# Altium PCB AltiumSM32PCB.PcbDoc
Units mm, origin at the board's own origin, x right, y up, seen from the top; angles counter-clockwise.
Board outline 30.5 x 32 mm, 4 copper layers (L1(Signal), L2(GND), L3(GND), L4(Signal)), stack 1.57 mm thick; 35 components, 27 nets, 169 pads, 95 vias.
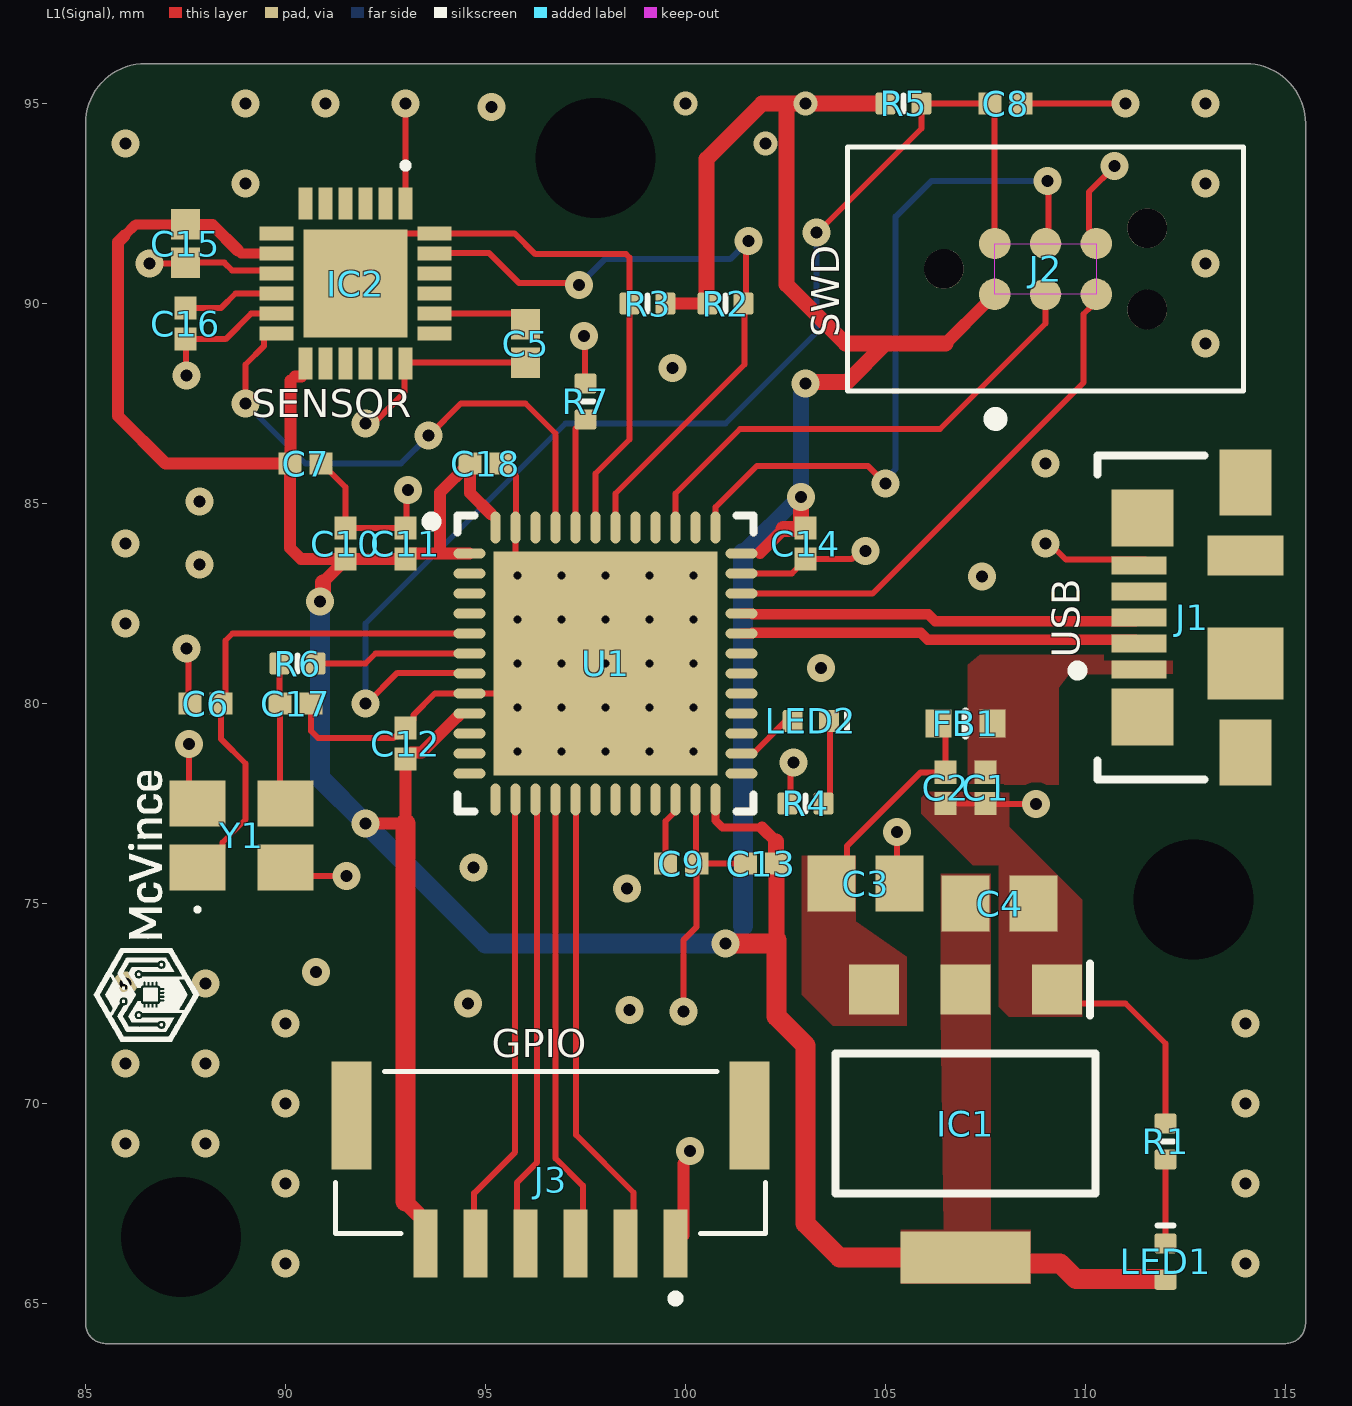
[diagram p0: L1(Signal) view]
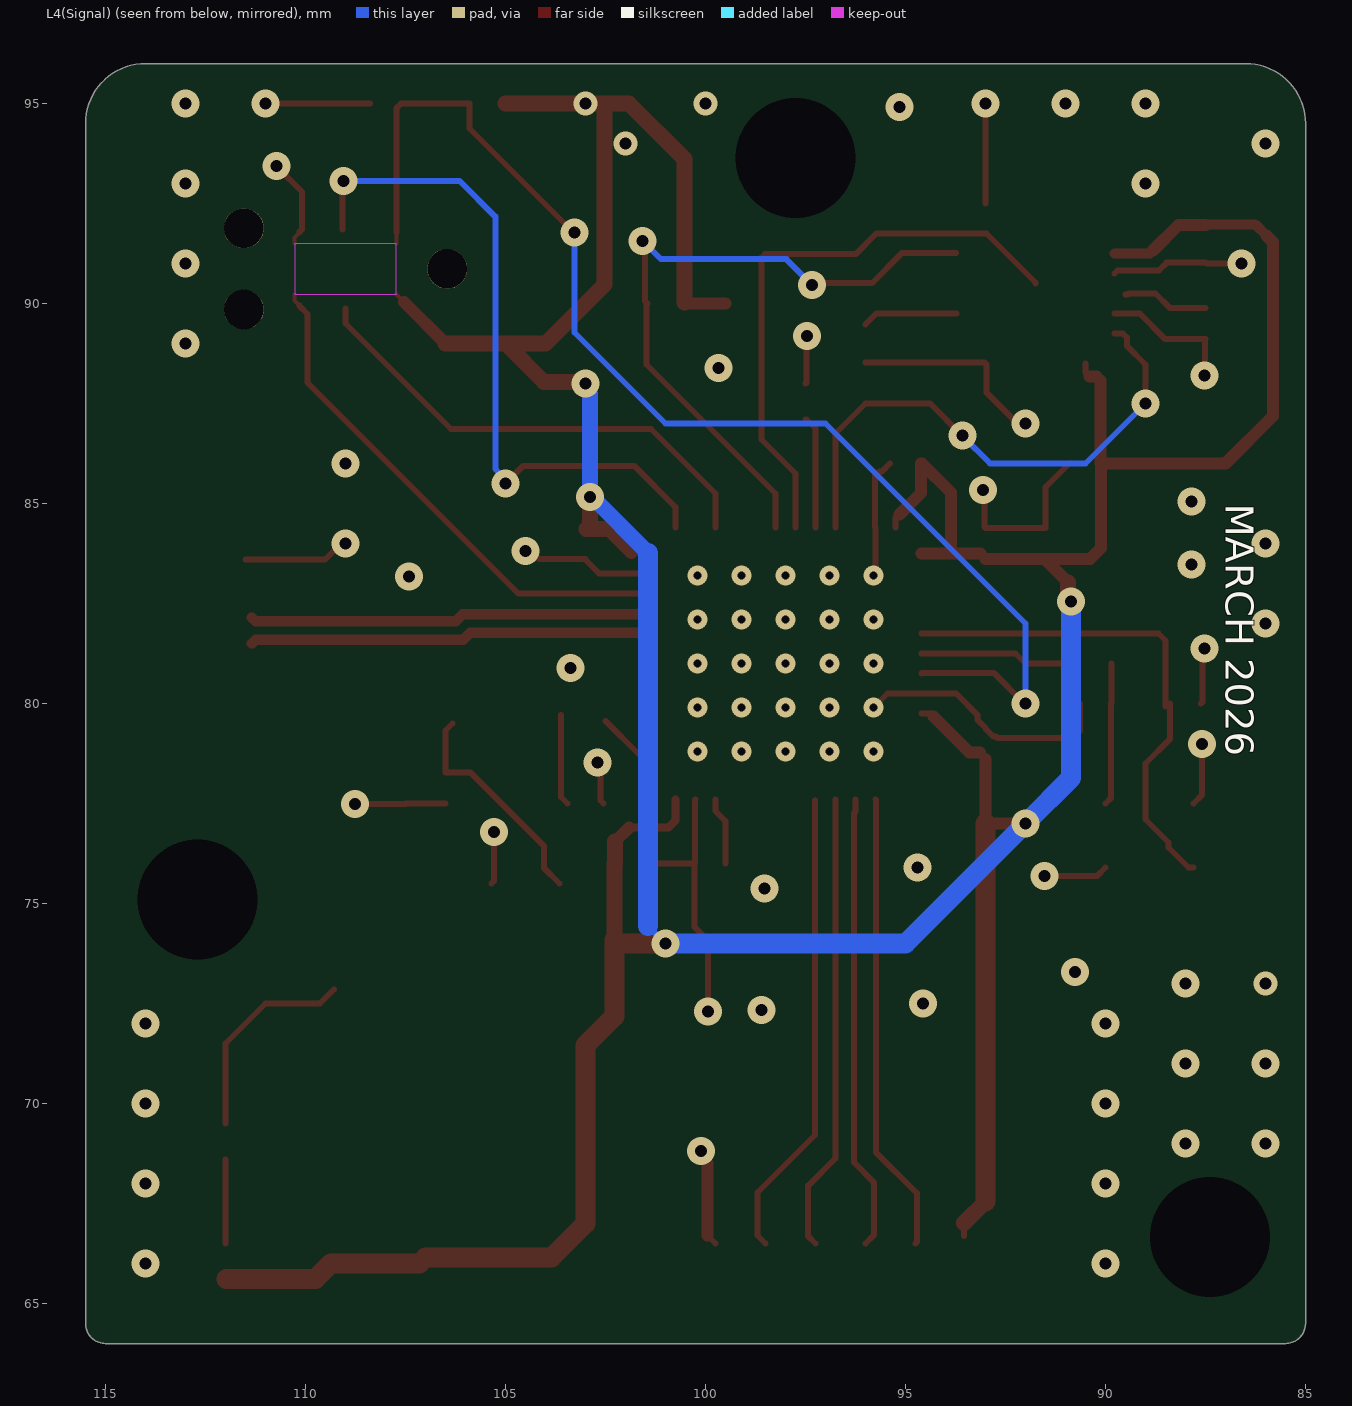
[diagram p1: L4(Signal) view, seen from below]
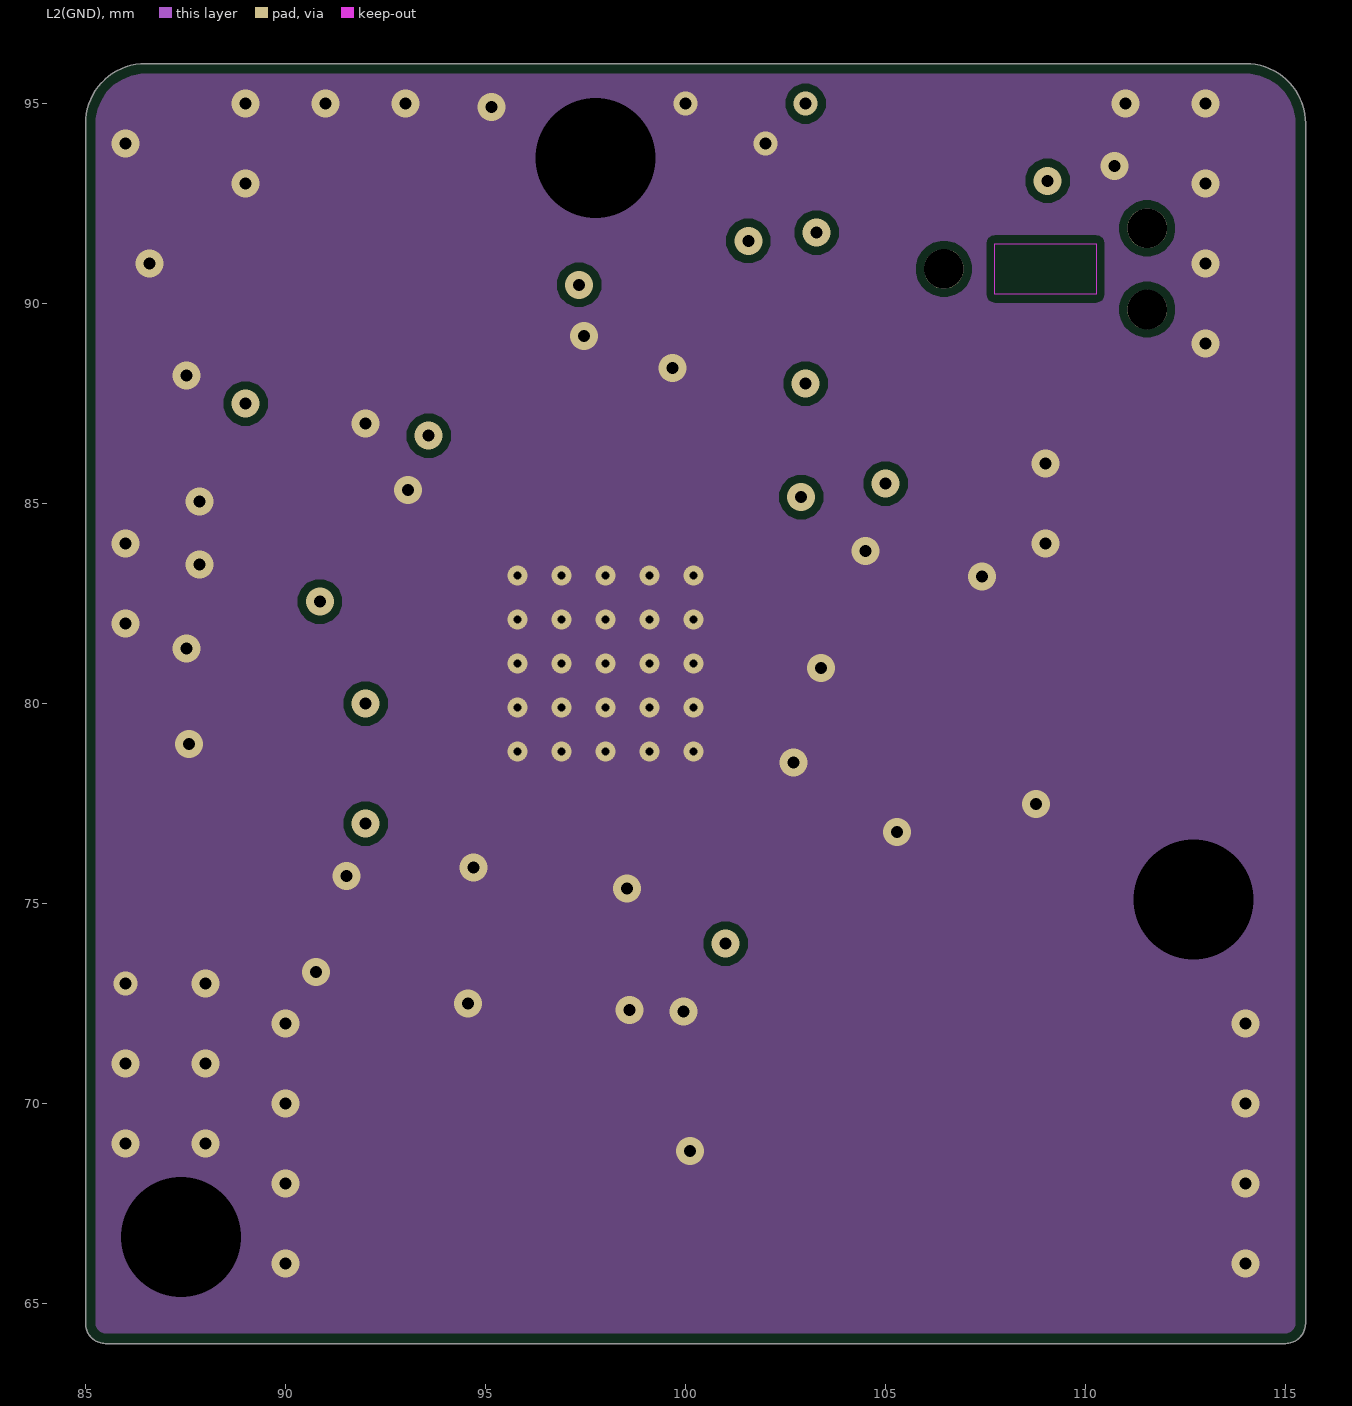
[diagram p2: L2(GND)]
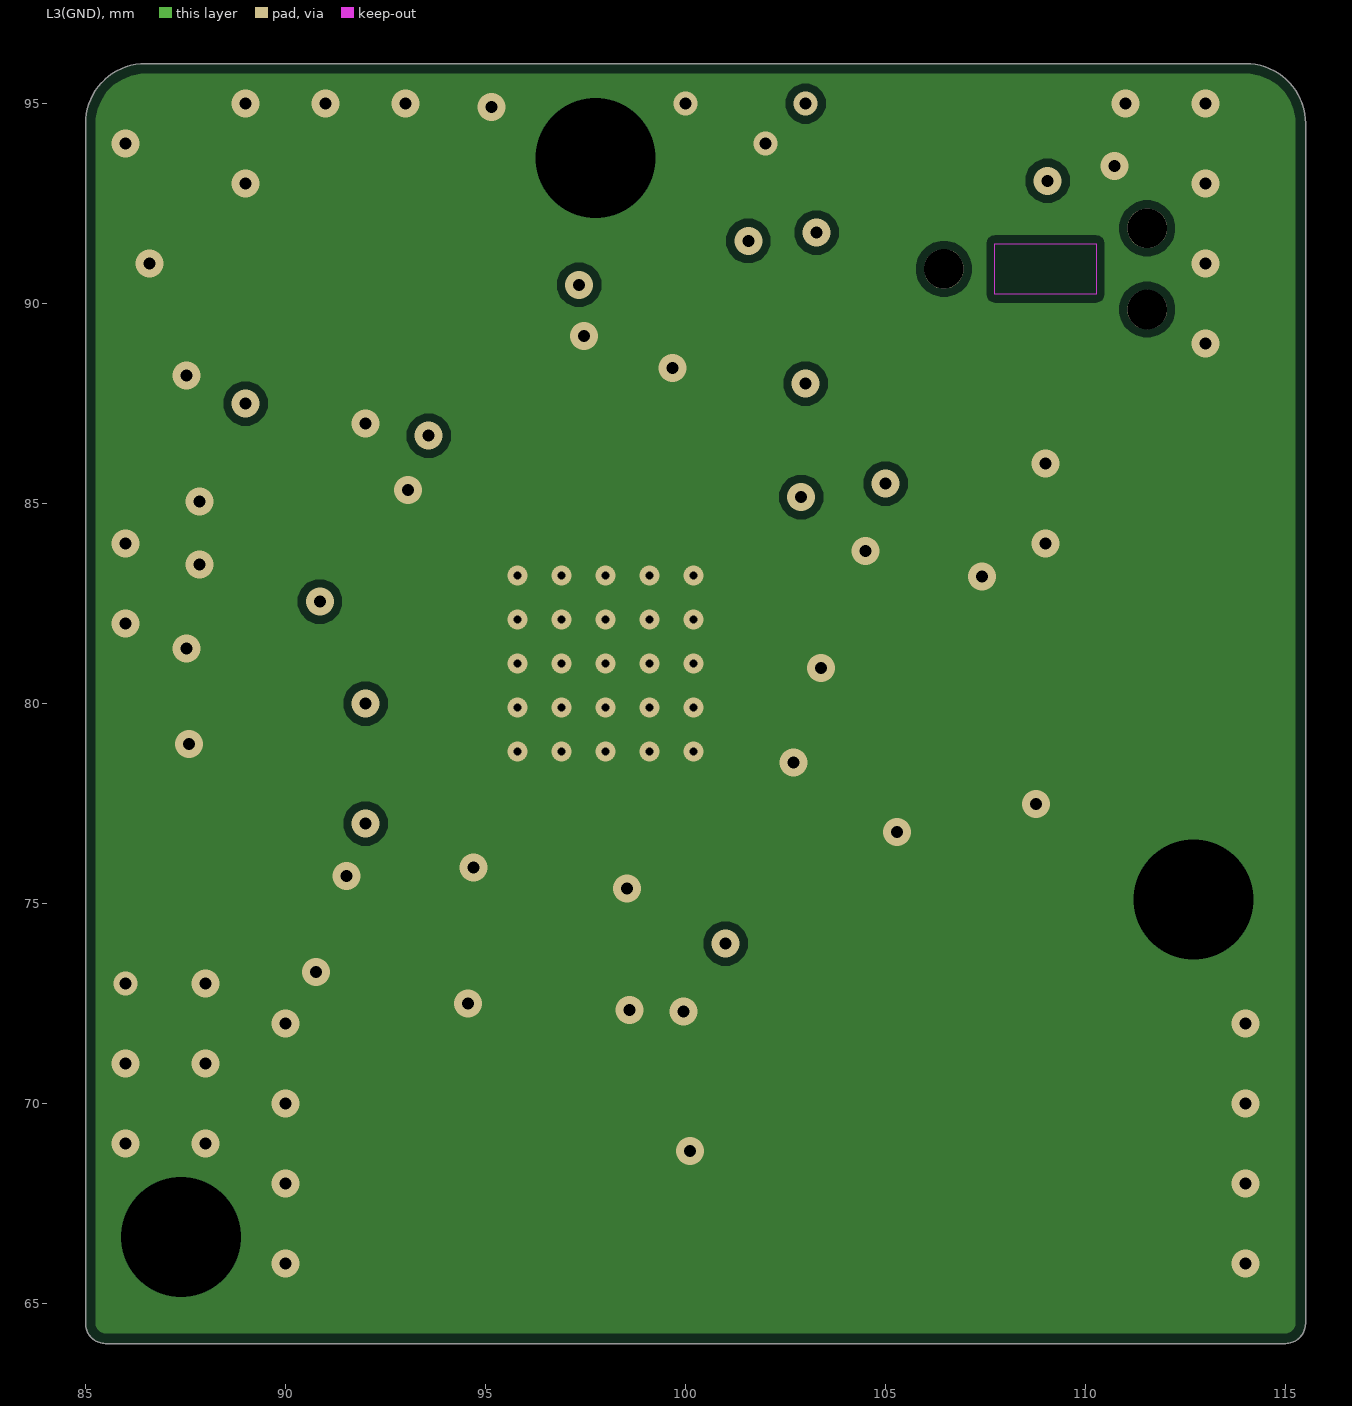
[diagram p3: L3(GND)]
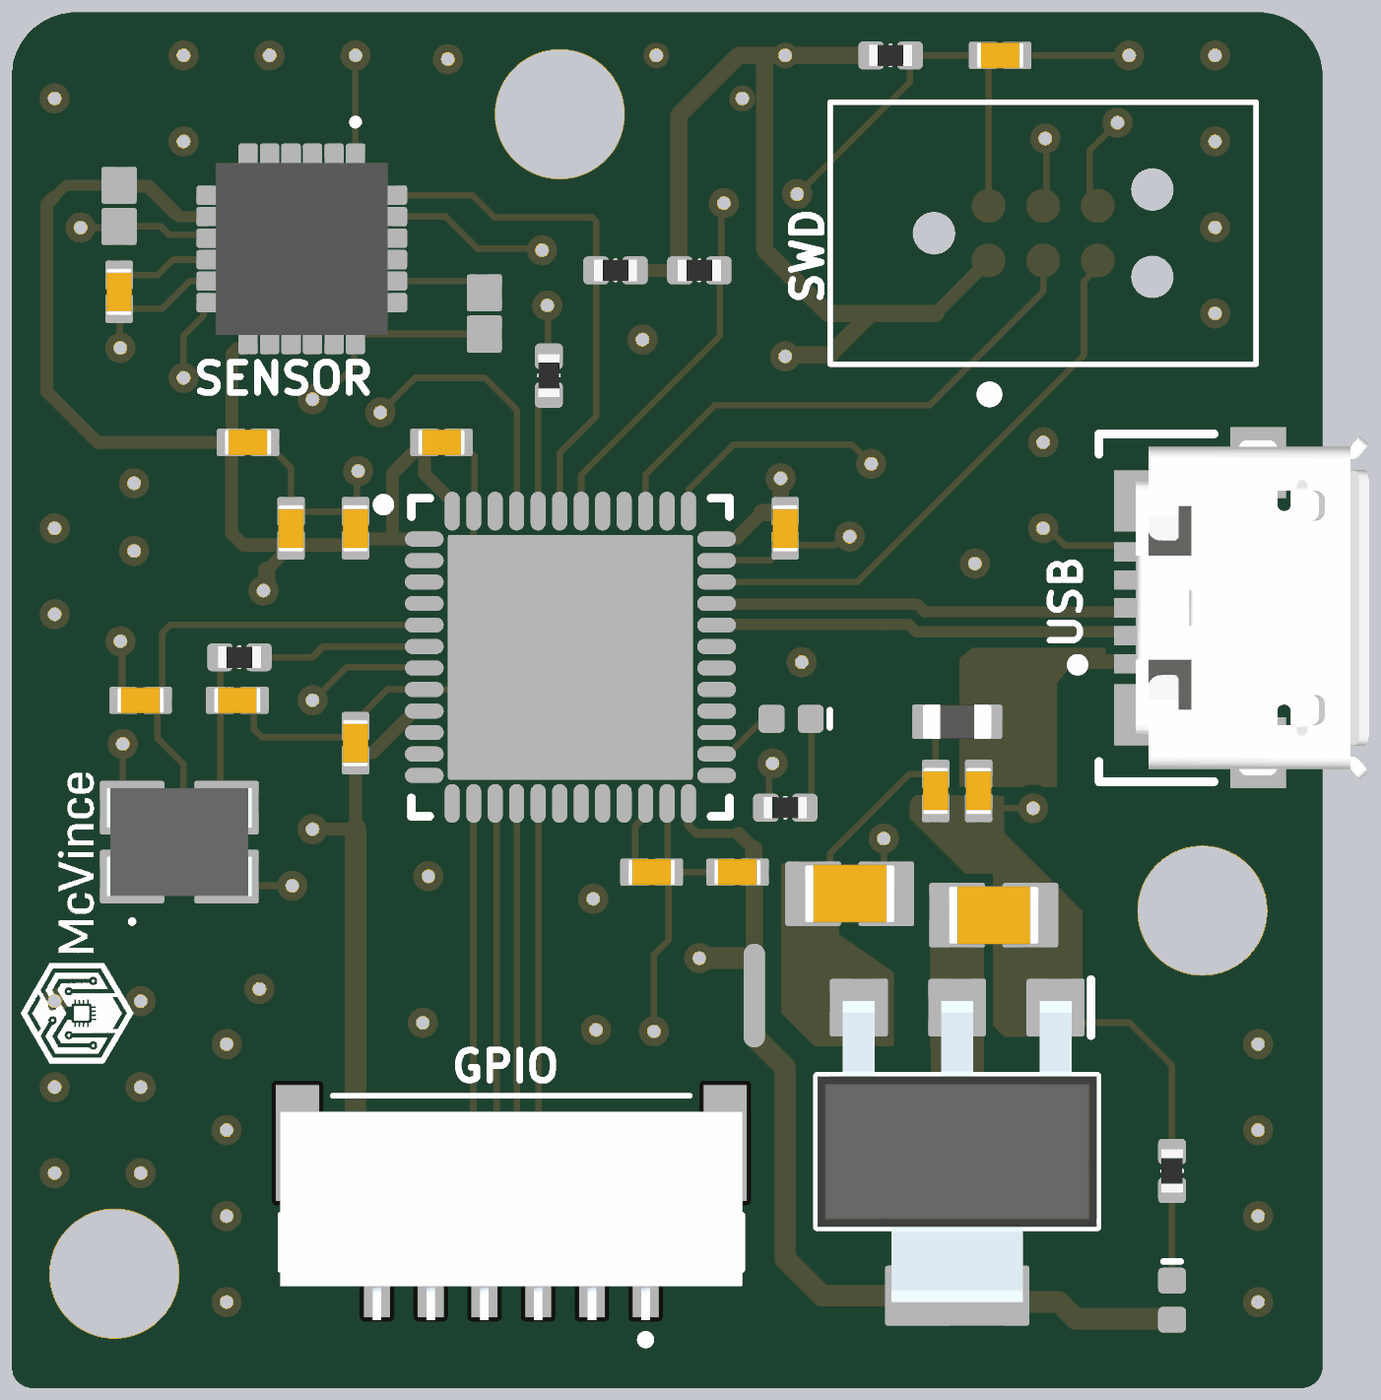
[diagram p4: 3D render of the assembled board from above, using the file's embedded part models]

## Layer stack, top to bottom
Top Solder: solder mask 0.0254, SM-001, Dk 4
L1(Signal): signal copper 0.035
Dielectric 1: prepreg 0.2, PP-017, Dk 4.6
L2(GND): signal copper 0.0175
Dielectric 2: core 1.065, Core-039, Dk 4.6
L3(GND): signal copper 0.0175
Dielectric 3: prepreg 0.2, PP-017, Dk 4.6
L4(Signal): signal copper 0.035
Bottom Solder: solder mask 0.0254, SM-001, Dk 4

## Board outline
85,64.5 ccw(c85.5,64.5) 85.5,64 115,64 ccw(c115,64.5) 115.5,64.5 115.5,94.5 ccw(c114,94.5) 114,96 86.5,96 ccw(c86.5,94.5) 85,94.5

## Design rules (kind name [scope] priority, off if disabled: settings)
BoardOutlineClearance [All] p1: gap=0.254 ignorepadtopadclearanceinfootprint=FALSE except(0: Arc-SplitContinuation Track-SplitContinuation SMDPad-SplitContinuation THPad-SplitContinuation Via-SplitContinuation Fill-SplitContinuation Poly-SplitContinuation Region-SplitContinuation Text-SplitContinuation)
Clearance [All] p1: gap=0.2 ignorepadtopadclearanceinfootprint=FALSE
DiffPairsRouting [All] p1: maxlimit=0.203 minlimit=0.203 mostfreqgap=0.203 toplayer_minwidth=0.26 toplayer_maxwidth=0.26 toplayer_prefwidth=0.26 bottomlayer_minwidth=0.26 bottomlayer_maxwidth=0.26 bottomlayer_prefwidth=0.26 impedanceprofiledriven=TRUE impedanceprofileid={EBFDF36F-0FDD-4D75-9C87-6BF0BFB171E8} impedanceprofilevalue=90.000000 maxuncoupledlength=12.7
HoleSize [All] p1: absolutevalues=TRUE maxlimit=2.54 minlimit=0.2 maxpercent=80.000 minpercent=20.000
HoleToHoleClearance [All] p1: gap=0.3 allowstackedmicrovias=TRUE
MinimumSolderMaskSliver [All] p1: minsoldermaskwidth=0.2
PasteMaskExpansion [All] p1: expansion=0.05
PlaneClearance [All] p1: clearance=0.2
PolygonConnect [All] p1: thpad.connectstyle=Relief thpad.reliefconductorwidth=0.35 thpad.reliefentries=4 thpad.polygonreliefangle="90 Angle" thpad.airgapwidth=0.35 smdpad.connectstyle=Relief smdpad.reliefconductorwidth=0.3 smdpad.reliefentries=4 smdpad.polygonreliefangle="90 Angle" smdpad.airgapwidth=0.3 via.connectstyle=Direct via.reliefconductorwidth=0.254 via.reliefentries=4 via.polygonreliefangle="90 Angle" via.airgapwidth=0.254
RoutingVias [All] p1: holewidth=0.3 width=0.6 viastyle="Through Hole" minholewidth=0.2 minwidth=0.45 maxholewidth=0.5 maxwidth=0.9
SilkToSilkClearance [All] p1: silktosilkclearance=0.2
SilkToSolderMaskClearance [IsPad] p1: minsilkscreentomaskgap=0.2 clearancetoexposedcopper=TRUE
SolderMaskExpansion [All] p1: expansion=0.2 istentingtop=TRUE soldermaskfromhole=TRUE
SupplyNets "Schematic Supply Nets_3" [InNet('VBUS')] p1: voltage=0.000
SupplyNets "Schematic Supply Nets_2" [InNet('+3V3')] p2: voltage=0.000
SupplyNets "Schematic Supply Nets_1" [InNet('GND')] p3: voltage=0.000
SupplyNets "Schematic Supply Nets" [InNet('+5V')] p4: voltage=0.000
UnRoutedNet [All] p1: checkbadconnections=TRUE
Width Signal [InNetClass('Signal')] p1: maxlimit=0.3 minlimit=0.1 preferedwidth=0.2
Width Power [InNetClass('POWER')] p2: maxlimit=0.5 minlimit=0.15 preferedwidth=0.3
21 further rules are at their usual default settings.

## Classes and differential pairs
net class Signal: GND "IMU CPOUT" "IMU INT" "IMU REGOUT" "IMU SCL" "IMU SDA" "LED PWR K" "MCU BOOT0" "MCU LED A" "MCU LED K" "MCU NRST" "MCU OSC IN" "MCU OSC OUT" "MCU PA4" "MCU PA5" "MCU PA6" "MCU PA7" "MCU SWCLK" "MCU SWDIO" "MCU SWO" "MCU VCAP1" USB_D_N USB_D_P VBUS "XTAL IN"
net class Power: +3V3 +5V
differential pair USB_D: +USB_D_P -USB_D_N

## Components (designator, comment, footprint, x,y, rotation, side; value= is the part's Value field where it differs from the comment)
C1 "Capacitor 0.1 uF +/- 5% 16 V 0402" CAPC1005X56X25LL10T15 107.5,77.89 r270 top value=2u2
C2 "Capacitor 0.1 uF +/- 5% 16 V 0402" CAPC1005X56X25LL10T15 106.5,77.89 r270 top value=2u2
C3 "Capacitor 10 uF +/- 10% 16 V 0805" CAPC2013X135X45NL10T25 104.5,75.5 r180 top value=22u
C4 "Capacitor 10 uF +/- 10% 16 V 0805" CAPC2013X135X45NL10T25 107.85,75 r180 top value=22u
C5 "2n2" CAPC1005X60X30ML05T10 96,89 r90 top
C6 "Capacitor 0.1 uF +/- 5% 16 V 0402" CAPC1005X56X25LL10T15 88,80 r0 top value=10pF
C7 "Capacitor 0.1 uF +/- 5% 16 V 0402" CAPC1005X56X25LL10T15 90.5,86 r180 top value=100nF
C8 "Capacitor 0.1 uF +/- 5% 16 V 0402" CAPC1005X56X25LL10T15 108,95 r180 top value=100nF
C9 "Capacitor 0.1 uF +/- 5% 16 V 0402" CAPC1005X56X25LL10T15 99.89,76 r0 top value=2.2uF
C10 "Capacitor 0.1 uF +/- 5% 16 V 0402" CAPC1005X56X25LL10T15 91.5,84 r90 top value=2u2
C11 "Capacitor 0.1 uF +/- 5% 16 V 0402" CAPC1005X56X25LL10T15 93,84 r270 top value=100nF
C12 "Capacitor 0.1 uF +/- 5% 16 V 0402" CAPC1005X56X25LL10T15 93,79 r270 top value=100nF
C13 "Capacitor 0.1 uF +/- 5% 16 V 0402" CAPC1005X56X25LL10T15 101.89,76 r0 top value=100nF
C14 "Capacitor 0.1 uF +/- 5% 16 V 0402" CAPC1005X56X25LL10T15 103,84 r90 top value=100nF
C15 "10nF" CAPC1005X60X30ML05T10 87.5,91.5 r270 top
C16 "Capacitor 0.1 uF +/- 5% 16 V 0402" CAPC1005X56X25LL10T15 87.5,89.5 r90 top value=100nF
C17 "Capacitor 0.1 uF +/- 5% 16 V 0402" CAPC1005X56X25LL10T15 90.25,80 r0 top value=10pF
C18 "Capacitor 0.1 uF +/- 5% 16 V 0402" CAPC1005X56X25LL10T15 95,86 r180 top value=100nF
FB1 "BLM18DN151SN1D" BLM18SP221SN1B 107,79.5 r180 top
IC1 "AMS1117-3.3" SOT229P700X180-4N 107,69.5 r270 top
IC2 "MPU-6050" MPU6050 91.75,90.5 r270 top
J1 "473460001" FP-473460001-MFG 113.65,82.15 r90 top
J2 "TC2030-IDC-NL" TAG_TC2030-IDC-NL 109,90.865 r0 top
J3 "SM06B-GHS-TB" JST_SM06B-GHS-TB 96.625,68.375 r180 top
LED1 "QBLP595-IG" QTB-QBLP595_V 112,66.045 r270 top
LED2 "QBLP595-IG" QTB-QBLP595_V 103.135,79.568 r180 top
R1 "2D2R2J" RESC0402(1005)_L 112,69.05 r270 top value=1k
R2 "2D2KR2J" RESC0402(1005)_L 101,90 r180 top value=2.2k
R3 "2D2KR2J" RESC0402(1005)_L 99.05,90 r0 top value=2.2k
R4 "2D2R2J" RESC0402(1005)_L 103,77.5 r180 top value=1k
R5 "10KR2F" RESC0402(1005)_L 105.45,95 r180 top value=10k
R6 "10KR2F" RESC0402(1005)_L 90.3,81 r180 top value=0R
R7 "10KR2F" RESC0402(1005)_L 97.5,87.55 r270 top value=10k
U1 "STM32F411CEU6" STM-UFQFPN48_L 98,81 r0 top
Y1 "TSX-322524.0000MF15X-AC0" TSX3225240000MF15XAC0 88.9,76.7 r0 top

## Footprints (in the part's own frame and the unit in brackets; to place one, negate y for a bottom-side part, rotate by r counter-clockwise, add the part's x,y. Pads: shape width x height; smd on the part's side, far side on the other; paste and mask are expansions set on the pad)
BLM18SP221SN1B [mm]
  rect 0.65x0.7 smd: 1(-0.675,0) 2(0.675,0)
  silkscreen extent 0,-0.3 0,0.3, body extent -0.8,-0.4 0.8,0.4, height 0.8
CAPC1005X56X25LL10T15 [mm] "Chip Capacitor, 2-Leads, Body 1.10x0.60mm, IPC High Density"
  rect 0.58x0.54 smd: 1(-0.39,0) 2(0.39,0)
  body extent -0.55,-0.3 0.55,0.3, height 0.56
CAPC1005X60X30ML05T10 [mm] "Chip Capacitor, 2-Leads, Body 1.00x0.50mm, IPC Low Density"
  rect 0.76x0.72 smd: 1(-0.48,0) 2(0.48,0)
  body extent -0.53,-0.28 0.53,0.27, height 0.6
CAPC2013X135X45NL10T25 [mm] "Chip Capacitor, 2-Leads, Body 2.10x1.35mm, IPC Medium Density"
  rect 1.2x1.4 smd: 1(-0.85,0) 2(0.85,0)
  body extent -1.05,-0.67 1.05,0.67, height 1.35
FP-473460001-MFG [mm]
  rect 0.45x1.38 smd paste+0 mask+0: 1(-1.3,2.31) 2(-0.65,2.31) 3(0,2.31) 4(0.65,2.31) 5(1.3,2.31)
  rect 1.425x1.55 smd paste+0 mask+0: 6(-2.488,2.225) 7(2.487,2.225)
  rect 1.65x1.3 smd paste+0 mask+0: 8(-3.375,-0.35) 11(3.375,-0.35)
  rect 1.8x1.9 smd paste+0 mask+0: 9(-1.15,-0.35)
  rect 1x1.9 smd paste+0 mask+0: 10(1.55,-0.35)
  silkscreen extent -4.04,0.67 4.05,3.97, body extent -4.3,-2.48 4.3,3.45, height 0.25
JST_SM06B-GHS-TB [mm]
  rect 0.6x1.7 smd paste+0 mask+0.102: 1(-3.125,1.875) 2(-1.875,1.875) 3(-0.625,1.875) 4(0.625,1.875) 5(1.875,1.875) 6(3.125,1.875)
  rect 1x2.7 smd paste+0 mask+0.102: MP1(-4.975,-1.325) MP2(4.975,-1.325)
  silkscreen extent -5.37,-2.43 5.37,3.35, body extent -5.38,-2.05 5.38,2.8, height 4.25
MPU6050 [mm]
  rect 0.8x0.35 smd: 1(-2,1.25) 2(-2,0.75) 3(-2,0.25) 4(-2,-0.25) 5(-2,-0.75) 6(-2,-1.25) 13(2,-1.25) 14(2,-0.75) 15(2,-0.25) 16(2,0.25) 17(2,0.75) 18(2,1.25)
  rect 0.35x0.85 smd: 7(-1.25,-1.975) 8(-0.75,-1.975) 9(-0.25,-1.975) 10(0.25,-1.975) 11(0.75,-1.975) 12(1.25,-1.975) 19(1.25,1.975) 20(0.75,1.975) 21(0.25,1.975) 22(-0.25,1.975) 23(-0.75,1.975) 24(-1.25,1.975)
  rect 2.7x2.6 smd: 25(0,0)
  silkscreen extent -3,1.2 -2.9,1.3, body extent -2,-2 2,2, height 0.88
QTB-QBLP595_V [mm] "SMD, 2-Leads, Body 1x0.5mm"
  rrect25% 0.5x0.55 smd: 1(-0.455,0) 2(0.455,0)
  silkscreen extent -0.9,-0.2 -0.9,0.2, body extent -0.5,-0.25 0.5,0.25, height 0.5
RESC0402(1005)_L [mm] "Chip Resistor, Body 1.0x0.5mm, IPC High Density"
  rrect25% 0.5x0.55 smd: 1(-0.45,0) 2(0.45,0)
  silkscreen extent 0,-0.2 0,0.2, body extent -0.5,-0.25 0.5,0.25, height 0.3
SOT229P700X180-4N [mm]
  rect 1.25x1.25 smd: 1(-3.35,2.29) 2(-3.35,0) 3(-3.35,-2.29)
  rect 1.3x3.25 smd: 4(3.35,0)
  silkscreen extent -4,-3.25 1.75,3.25, body extent -3.5,-3.25 3.5,3.25, height 1.8
STM-UFQFPN48_L [mm] "QFN, 48-Leads, Body 7.1x7.1mm, Pitch 0.5mm, Thermal Pad 5.6x5.6mm, IPC High Density"
  oval 0.8x0.25 smd: 1(-3.4,2.75) 2(-3.4,2.25) 3(-3.4,1.75) 4(-3.4,1.25) 5(-3.4,0.75) 6(-3.4,0.25) 7(-3.4,-0.25) 8(-3.4,-0.75) 9(-3.4,-1.25) 10(-3.4,-1.75) 11(-3.4,-2.25) 12(-3.4,-2.75) 25(3.4,-2.75) 26(3.4,-2.25) 27(3.4,-1.75) 28(3.4,-1.25) 29(3.4,-0.75) 30(3.4,-0.25) 31(3.4,0.25) 32(3.4,0.75) 33(3.4,1.25) 34(3.4,1.75) 35(3.4,2.25) 36(3.4,2.75)
  oval 0.25x0.8 smd: 13(-2.75,-3.4) 14(-2.25,-3.4) 15(-1.75,-3.4) 16(-1.25,-3.4) 17(-0.75,-3.4) 18(-0.25,-3.4) 19(0.25,-3.4) 20(0.75,-3.4) 21(1.25,-3.4) 22(1.75,-3.4) 23(2.25,-3.4) 24(2.75,-3.4) 37(2.75,3.4) 38(2.25,3.4) 39(1.75,3.4) 40(1.25,3.4) 41(0.75,3.4) 42(0.25,3.4) 43(-0.25,3.4) 44(-0.75,3.4) 45(-1.25,3.4) 46(-1.75,3.4) 47(-2.25,3.4) 48(-2.75,3.4)
  rect 5.6x5.6 smd: 49(0,0)
  silkscreen extent -4.47,-3.7 3.7,3.7, body extent -3.55,-3.55 3.55,3.55, height 0.6
TAG_TC2030-IDC-NL [mil]
  round 30.98 smd paste-39.37: 1(-50,-25) 2(-50,25) 3(0,-25) 4(0,25) 5(50,-25) 6(50,25)
  round 39.02 hole 39.02 unplated: MH(-100,0) MH(100,-40) MH(100,40)
  Keep-Out Layer region: 50,-25.03 -50.06,-25.03 -50.06,25 50,25
  silkscreen extent -195,-154 195,120
TSX3225240000MF15XAC0 [mm]
  rect 1.4x1.15 smd: 1(-1.1,-0.8) 2(1.1,-0.8) 3(1.1,0.8) 4(-1.1,0.8)
  silkscreen extent -1.15,-1.9 -1.05,-1.8, body extent -1.69,-1.26 1.69,1.26, height 0.7

## Part data
C1 C2 C6 C7 C8 C9 C10 C11 C12 C13 C14 C16 C17 C18: library part CMP-001-00001-6, "Chip Capacitor, 0.1 uF, +/- 5%, 16 V, 0402 (1005 Metric)", Capacitor Type=Ceramic, Case/Package=0402, Max Operating Temperature=125°C, Min Operating Temperature=-55°C, Tolerance=5%, Voltage Rating=16V, Mounting Technology=SM, Pins=2, RoHS Compliant=True
C3 C4: library part CMP-001-00015-6, "Chip Capacitor, 10 uF, +/- 10%, 16 V, 0805 (2012 Metric)", Capacitor Type=Ceramic, Case/Package=0805, Max Operating Temperature=85°C, Min Operating Temperature=-55°C, Tolerance=10%, Voltage Rating=16V, Mounting Technology=SM, Pins=2, RoHS Compliant=True
C5 C15: library part CMP-2008-02193-1, Manufacturer=Kemet, Part Number=C0402T103K4RACTU
FB1: "Ferrite Bead", Manufacturer_Name="Murata Electronics", Mouser Part Number=81-BLM18DN151SN1D, Arrow Part Number=BLM18DN151SN1D, Arrow Price/Stock=https://www.arrow.com/en/products/blm18dn151sn1d/murata-manufacturing?utm_currency=USD&region=nac, Datasheet Link=http://www.murata.com/~/media/webrenewal/support/library/catalog/products/emc/emifil/c31e.ashx?la=en-gb, Height=0.95mm, Manufacturer_Part_Number=BLM18DN151SN1D, Mouser Price/Stock=https://www.mouser.co.uk/ProductDetail/Murata-Electronics/BLM18DN151SN1D?qs=17u8i%2FzlE88YmV2XnmFi9A%3D%3D
IC1: "Integrated Circuit", Manufacturer_Name="ams OSRAM", Datasheet Link=http://www.advanced-monolithic.com/pdf/ds1117.pdf, Height=1.8mm, Manufacturer_Part_Number=AMS1117-3.3
IC2: "Integrated Circuit", Manufacturer_Name=TDK, Mouser Part Number=410-MPU-6050, Arrow Part Number=MPU-6050, Arrow Price/Stock=https://www.arrow.com/en/products/mpu-6050/invensense?region=nac, Datasheet Link=https://product.tdk.com/system/files/dam/doc/product/sensor/mortion-inertial/imu/data_sheet/mpu-6000-datasheet1.pdf, Height=0.95mm, Manufacturer_Part_Number=MPU-6050, Mouser Price/Stock=https://www.mouser.co.uk/ProductDetail/TDK-InvenSense/MPU-6050?qs=u4fy%2FsgLU9O14B5JgyQFvg%3D%3D
J1: library part CMP-2000-05246-2, "CONN RCPT USB2.0 MICRO B SMD R/A", Current Rating=1.8A, Manufacturer=Molex, Package=0, Temperature="-30°C to +85°C", Temperature Range High=+85°C, Temperature Range Low=-30°C, Voltage Rating=30V, Automotive=No, Category=Conn, ComponentLink2Description=Datasheet, ComponentLink2URL=https://www.molex.com/webdocs/datasheets/pdf/en-us/0473460001_IO_CONNECTORS.pdf, Conn Orientation="Right Angle", Contact Material=Gold,Nickel, Device Class L1=Connectors, Device Class L2="USB Connectors", Device Class L3=unset, Digikey Description="CONN RCPT USB2.0 MICRO B SMD R/A", Footprint Url=https://www.molex.com/pdm_docs/sd/473460001_sd.pdf, Height=2.945mm, Is Female=yes, Lead Free=Yes, Manufacturer Part Number=473460001, Number Of Contacts=5, Octopart=https://octopart.com/47346-0001-molex-7164928, Pitch=0.65mm, RoHS=TRUE, Shielding=true, Usb Standard="USB 2.0"
J2: "CABLE ADAPTER 6 POS", Package=None, Availability=Unavailable, MP=TC2030-IDC-NL, Price=None
J3: "Connector Header Surface Mount, Right Angle 6 position 0.049 (1.25mm)", Package=None, Check_prices=https://www.snapeda.com/parts/SM06B-GHS-TB/JST/view-part/?ref=eda, MF="JST Sales", MP=SM06B-GHS-TB, SnapEDA_Link=https://www.snapeda.com/parts/SM06B-GHS-TB/JST/view-part/?ref=snap
LED1 LED2: library part CMP-007-00041-3, "Chip LED 0402, Green, 0.02 A, 3.1 to 3.7 V, -40 to 80 degC, 2-Pin SMD, RoHS, Tape and Reel", Case/Package=0402, Colour=Green, Mounting Technology=SMT, Pins=2, RoHS Compliant=Yes
R1 R4: library part CMP-009-00088-2, "2R2 0.063W 5% 0402 (1005 Metric)  SMD", Case/Package=0402, Power=63mW, Tolerance=5%, Mounting Technology=SMT, Pins=2
R2 R3: library part CMP-009-00087-2, "2K2 0.063W 5% 0402 (1005 Metric)  SMD", Case/Package=0402, Power=63mW, Tolerance=5%, Mounting Technology=SMT, Pins=2
R5 R6 R7: library part CMP-009-00066-2, "10K 0.063W 1% 0402 (1005 Metric)  SMD", Case/Package=0402, Power=63mW, Tolerance=1%, Mounting Technology=SMT, Pins=2
U1: library part CMP-0243-00165-1, "ARM Cortex-M4 32-bit MCU+FPU, 512 KB Flash, 128 KB RAM, 36 I/Os, 48-Pin UFQFPN, -40 to 85 degC, Tray", I/Os (High Current)=36, Operating Frequency(F) (Processor speed) (MHz)=100, Package Description=UFQFPN48, Package Reference="48-Pin Ultra Thin Fine Pitch Quad Flat No-Lead, 7 x 7 x 0.6 mm Body, 0.5 mm Pitch, Exposed Pad", Supply Voltage(Vcc) min (V)=1.7, ComponentLink1Description="Manufacturer URL", ComponentLink1URL=http://www.st.com/, ComponentLink2Description=Datasheet, ComponentLink2URL=http://www.st.com/st-web-ui/static/active/en/resource/technical/document/datasheet/DM00115249.pdf, Core="ARM Cortex-M4", DatasheetVersion="Rev. 6", FLASH Size (Prog) (kB)=512, Internal RAM Size (kB)=128, Mounting Technology="Surface Mount", Packing=Tray
Y1: "Crystal or Oscillator", Manufacturer_Name="Miyazaki Epson Corporation", Datasheet Link=https://support.epson.biz/td/api/doc_check.php?dl=brief_TSX-3225&lang=en, Height=0.6mm, Manufacturer_Part_Number=TSX-322524.0000MF15X-AC0

## Free pads (board coordinates)
  oval 3.2x0 hole 3: MH2(87.388,66.662) MH3(97.754,93.632) MH4(112.704,75.104)

## Via types
v1: diameter 0.7, hole 0.3, L1(Signal) to L4(Signal), tented both sides, 66 vias
v2: diameter 0.5, hole 0.2, L1(Signal) to L4(Signal), tented both sides, 25 vias
v3: diameter 0.6, hole 0.3, L1(Signal) to L4(Signal), tented both sides, 4 vias

## Nets (pads, with @x,y where several pads share a name; then routed paths per layer and width w, separated by ;. In a path a pad name is that pad's centre, name@x,y a point inside that pad or via, vN(x,y) a via of type N, cw(c..) or ccw(c..) an arc to the next point about the centre after c; other vN are vias at no path point)
+3V3: C4.2 C7.2 C10.1 C11.2 C12.2 C13.2 C14.2 C15.1 C18.2 IC1.2 IC1.4 IC2.8 IC2.13 J2.1 J3.6 LED1.2 R2.2 R3.2 R5.2 U1.1 U1.9 U1.24 U1.36 U1.48 | length 123.9
  L1(Signal) w0.1: J2.1@107.534,90.034 J2.1
  L1(Signal) w0.15: 90.13,88.074 90.231,88.176 ; IC2.13@90.4,88.176 90.5,88.276 IC2.13 ; v1(90.859,82.55) v1@90.935,82.627 ; C10.1@91.5,83.59 C10.1 ; C12.2@92.985,78.625 C12.2@93.142,78.782 ; C11.2@93,83.63 C11.2@93.12,83.75 ; J3.6@93.54,66.691 J3.6@93.54,67.01 ; U1.9@94.306,79.681 94.306,79.704 94.352,79.75 U1.9 ; C18.2@94.59,86 C18.2 ; U1.48@95.15,84.725 95.173,84.725 95.25,84.648 U1.48 ; U1.36 101.414,83.764 101.856,83.764 ; 102.193,74 102.28,74.087 ; C13.2@102.266,76.014 C13.2 ; C14.2@102.891,84.499 C14.2 C14.2@102.973,84.363 ; v1(103,88) v1@103.038,88.038 ; IC1.4 IC1.4@107.15,66 ; LED1.2@111.978,65.612 LED1.2
  L1(Signal) w0.2: U1.24 100.75,77.076 100.926,76.9 101.91,76.9
  L1(Signal) w0.25: 85.978,91.7 86.258,91.98 C15.1 ; 88.814,91.325 88.888,91.25 IC2.8
  L1(Signal) w0.3: 85.978,91.7 85.817,91.539 85.817,87.183 87,86 C7.2 90.11,83.89 90.39,83.61 C10.1 C11.2 ; C15.1@87.5,91.96 88.179,91.96 88.814,91.325 ; C7.2@90.13,86 90.13,88.074 ; 90.231,88.176 IC2.13@90.4,88.176 ; 90.935,83.025 C10.1@91.5,83.59 ; v1(92,77) 93,77 C12.2 ; C11.2@93.12,83.75 93.86,83.75 ; C12.2@93.142,78.782 93.407,78.782 U1.9@94.306,79.681 ; C18.2@94.59,86 93.86,85.27 93.86,83.75 ; U1.1 93.86,83.75 ; C18.2 94.61,85.265 U1.48@95.15,84.725 ; R3.2 R2.2 ; 101.856,83.764 102.456,84.363 ; 101.91,76.9 102.266,76.544 ; 106.5,89 J2.1@107.534,90.034
  L1(Signal) w0.4: v1@90.935,82.627 90.935,83.025 ; 93,67.55 J3.6@93.54,67.01 ; R2.2@100.524,90.026 100.524,93.608 101.916,95 102.524,95 ; C13.2@102.266,76.014 102.266,76.544 ; 102.28,74.087 C13.2 ; 102.456,84.363 C14.2@102.973,84.363 ; C14.2@102.891,84.499 v1(102.891,85.163) ; v1@103.038,88.038 104.038,88.038 105,89 ; R5.2 102.524,95 ; 106.5,89 105,89 ; 102.524,95 102.524,90.476 104,89 105,89
  L1(Signal) w0.5: 93,67.55 93,77 ; v1(101,74) 102.193,74 ; 102.28,74.087 102.28,72.174 103,71.454 103,67 103.85,66.15 IC1.4 ; IC1.4@107.15,66 109.368,66 109.756,65.612 LED1.2@111.978,65.612
  L4(Signal) w0.15: v1(101,74) 101.436,74.436 ; v1@102.837,85.163 v1(102.891,85.163) ; v1@102.891,87.742 103,87.851 v1(103,88)
  L4(Signal) w0.4: 101.436,83.762 v1@102.837,85.163 ; v1(102.891,85.163) v1@102.891,87.742
  L4(Signal) w0.5: v1(90.859,82.55) 90.859,78.141 91.987,77.013 95,74 v1(101,74) ; 101.436,74.436 101.436,83.762
  other v3: 103,95
+5V: C2.1 C3.2 FB1.2 IC1.3 | length 5.6
  L1(Signal) w0.15: C3.2 104.043,75.893 104.043,76.443 105.88,78.28 C2.1 106.5,79.325 FB1.2
GND: C1.2 C2.2 C3.1 C4.1 C5.1 C6.1 C7.1 C8.1 C9.2 C10.2 C11.1 C12.1 C13.1 C14.1 C15.2 C16.1 C17.2 C18.1 IC1.1 IC2.1 IC2.9 IC2.11 IC2.18 J1.5 J2.6 J3.1 pad.MH2 pad.MH3 pad.MH4 R1.1 R4.2 R7.1 U1.8 U1.23 U1.35 U1.47 U1.49 Y1.2 Y1.4 | length 64
  L1(Signal) w0.1: J2.6@110.148,91.775 110.27,91.653 J2.6
  L1(Signal) w0.15: v1(86.601,90.995) 87.476,90.995 C15.2 88.473,91.02 88.668,90.825 89.7,90.825 IC2.9 ; v1(87.528,88.196) 87.514,88.21 87.514,89.096 C16.1 88.502,89.11 89.142,89.75 IC2.11 ; v1(87.531,81.372) 87.57,81.332 87.57,80.04 C6.1 ; v1(87.585,78.983) 87.585,77.715 Y1.4 ; Y1.2 90.215,75.685 v1(91.527,75.685) ; C17.2 90.64,79.313 90.816,79.138 92.704,79.138 92.742,79.175 92.805,79.175 93,79.37 C12.1 93.195,79.585 93.195,79.71 93.738,80.253 U1.8@94.597,80.253 ; C7.1 90.91,86 91.5,85.41 C10.2 C11.1 93.031,84.421 93.031,85.302 v1(93.061,85.333) ; v1(92,87) 92.105,87.105 92.306,87.105 92.971,87.771 92.971,88.471 93.02,88.52 C5.1 ; IC2.1 v1(93,95) ; U1.8 95.45,80.25 v2(95.8,79.9) ; C18.1 95.585,85.805 95.645,85.805 95.764,85.686 95.764,84.414 U1.47 95.75,83.25 v2(95.8,83.2) ; v1(97.463,89.183) 97.482,89.164 97.482,88.018 R7.1 ; J3.1 J3.1@99.95,66.7 ; v1(99.944,72.298) 99.944,74.079 100.28,74.415 C9.2 ; v1@99.95,68.502 100.107,68.658 v1(100.107,68.807) ; U1.23 100.26,77.59 100.26,76.02 C9.2 ; U1.35 102.66,83.25 103,83.59 C14.1 104.152,83.61 104.35,83.808 v1(104.499,83.808) ; C13.1 C9.2 ; R4.2 102.626,77.576 102.626,78.455 v1(102.703,78.532) ; v1(105.29,76.782) 105.29,75.56 C3.1 ; C2.2 C1.2 107.507,77.493 108.759,77.493 v1(108.766,77.487) ; C8.1 v1(111,95) ; v1(109,84) 109.108,84 109.508,83.6 J1.5@111.5,83.6 ; IC1.1 109.64,72.5 111,72.5 112,71.5 R1.1 ; J2.6@110.148,91.775 110.148,91.794 110.087,91.855 110.087,92.793 v1(110.73,93.435)
  L1(Signal) w0.3: J3.1@99.95,66.7 v1@99.95,68.502
  other v1: 90,66 114,66 90,68 114,68 86,69 88,69 90,70 114,70 86,71 88,71 90,72 114,72 98.597,72.332 94.566,72.496 88,73 90.764,73.283 98.531,75.38 94.697,75.905 103.381,80.886 86,82 107.412,83.18 87.848,83.475 86,84 87.848,85.048 109,86 99.678,88.39 113,89 113,91 89,93 113,93 86,94 95.148,94.914 89,95 91,95 113,95
  other v2: 95.8,78.8 96.9,78.8 98,78.8 99.1,78.8 100.2,78.8 96.9,79.9 98,79.9 99.1,79.9 100.2,79.9 95.8,81 96.9,81 98,81 99.1,81 100.2,81 95.8,82.1 96.9,82.1 98,82.1 99.1,82.1 100.2,82.1 96.9,83.2 98,83.2 99.1,83.2 100.2,83.2
  other v3: 86,73 102,94 100,95
"IMU CPOUT": C5.2 IC2.20 | length 2.4
  L1(Signal) w0.15: IC2.20 95.73,89.75 C5.2
"IMU INT": IC2.12 U1.45 | length 13.8
  L1(Signal) w0.15: v1(89,87.5) 89,88.475 89.466,88.941 89.466,89.15 89.566,89.25 IC2.12 ; v1(93.579,86.696) 94.383,87.5 96,87.5 96.75,86.75 U1.45
  L4(Signal) w0.15: v1(89,87.5) 90.5,86 92.883,86 v1(93.579,86.696)
"IMU REGOUT": C16.2 IC2.10 | length 2.2
  L1(Signal) w0.15: C16.2 88.39,89.89 88.75,90.25 89.425,90.25 89.45,90.225 IC2.10@89.5,90.225
"IMU SCL": IC2.23 R2.1 U1.42 | length 17.2
  L1(Signal) w0.15: IC2.23@93.733,91.258 95.09,91.258 95.839,90.509 97.299,90.509 v1(97.34,90.468) ; U1.42 98.25,85.25 101.474,88.474 101.474,89.976 R2.1 101.51,90.06 101.51,91.506 v1(101.57,91.566)
  L4(Signal) w0.15: v1(97.34,90.468) 97.981,91.109 101.114,91.109 v1(101.57,91.566)
"IMU SDA": IC2.24 IC2.25 R3.1 U1.43 | length 14.7
  L1(Signal) w0.15: IC2.25 91.75,90.525 92.975,91.75 IC2.24 95.727,91.75 96.244,91.233 98.512,91.233 98.6,91.145 R3.1 98.6,86.6 97.75,85.75 U1.43
"LED PWR K": LED1.1 R1.2 | length 2.1
  L1(Signal) w0.15: LED1.1 R1.2
"MCU BOOT0": R7.2 U1.44 | length 2.8
  L1(Signal) w0.15: U1.44 97.25,86.875 97.475,87.1 R7.2
"MCU LED A": LED2.2 U1.26 | length 1.4
  L1(Signal) w0.15: U1.26 101.689,78.75 LED2.2@102.497,79.559
"MCU LED K": LED2.1 R4.1 | length 2.3
  L1(Signal) w0.15: R4.1 103.613,77.663 LED2.1@103.613,79.708
"MCU NRST": C8.2 J2.2 R5.1 U1.7 | length 31.3
  L1(Signal) w0.1: J2.2 J2.2@107.73,91.775
  L1(Signal) w0.15: v1(92,80) 92.031,80 92.797,80.766 94.584,80.766 U1.7 ; v1(103.275,91.775) 103.3,91.775 105.9,94.375 R5.1 C8.2 107.73,94.88 J2.2@107.73,91.775
  L4(Signal) w0.15: v1(92,80) 92,82 97,87 101,87 103.275,89.275 v1(103.275,91.775)
"MCU OSC IN": C6.2 U1.5 Y1.1 | length 12.7
  L1(Signal) w0.15: Y1.1 87.925,75.9 88.425,76.4 88.425,76.525 89,77.1 89,78.5 88.39,79.11 C6.2 ; C6.2@88.5,79.931 88.5,81.574 88.676,81.75 U1.5
"MCU OSC OUT": R6.1 U1.6 | length 4
  L1(Signal) w0.15: R6.1 92,81 92.25,81.25 U1.6
"MCU PA4": J3.5 U1.14 | length 11.5
  L1(Signal) w0.15: J3.5 94.714,66.536 94.714,67.758 95.741,68.785 95.741,77.591 U1.14
"MCU PA5": J3.4 U1.15 | length 11.4
  L1(Signal) w0.15: J3.4 95.792,66.708 95.792,68.032 96.288,68.528 96.288,77.26 96.25,77.298 U1.15
"MCU PA6": J3.3 U1.16 | length 11.5
  L1(Signal) w0.15: U1.16 96.751,68.631 97.435,67.946 97.435,66.685 J3.3
"MCU PA7": J3.2 U1.17 | length 11.8
  L1(Signal) w0.15: U1.17@97.26,77.582 97.264,77.577 97.264,69.213 98.7,67.777 98.7,66.7 J3.2
"MCU SWCLK": J2.4 U1.37 | length 17.5
  L1(Signal) w0.15: U1.37 100.75,84.907 101.786,85.944 104.556,85.944 v1(105,85.5) ; v1(109.05,93.068) 109.072,93.046 J2.4@109.072,91.85
  L4(Signal) w0.15: v1(105,85.5) 105,85.611 105.252,85.863 105.252,92.169 106.151,93.068 v1(109.05,93.068)
"MCU SWDIO": J2.5 U1.34 | length 13.1
  L1(Signal) w0.1: J2.5@110.148,89.954 110.27,90.076 J2.5
  L1(Signal) w0.15: U1.34 104.679,82.75 109.95,88.021 109.95,89.738 110.148,89.936 J2.5@110.148,89.954
"MCU SWO": J2.3 U1.39 | length 12.2
  L1(Signal) w0.15: U1.39 99.75,85.25 101.362,86.862 106.362,86.862 109,89.5 J2.3@109,89.879
"MCU VCAP1": C9.1 U1.22 | length 1.7
  L1(Signal) w0.15: C9.1 99.5,77.061 99.75,77.311 U1.22
USB_D_N: J1.2 U1.32 | length 10.1
  L1(Signal) w0.26: U1.32 101.665,81.75 101.683,81.768 105.881,81.768 106.056,81.593 111.247,81.593 J1.2
USB_D_P: J1.3 U1.33 | length 10.1
  L1(Signal) w0.26: U1.33 101.665,82.25 101.683,82.232 106.073,82.232 106.248,82.057 111.247,82.057 J1.3
VBUS: C1.1 FB1.1 J1.1
"XTAL IN": C17.1 R6.2 Y1.3 | length 3.6
  L1(Signal) w0.15: R6.2 89.855,80.995 89.855,80.005 C17.1 89.86,77.64 Y1.3
pads on no net: IC2.2 IC2.3 IC2.4 IC2.5 IC2.6 IC2.7 IC2.14 IC2.15 IC2.16 IC2.17 IC2.19 IC2.21 IC2.22 J1.4 J1.6 J1.7 J1.8 J1.9 J1.10 J1.11 J2.MH J3.MP1 J3.MP2 U1.2 U1.3 U1.4 U1.10 U1.11 U1.12 U1.13 U1.18 U1.19 U1.20 U1.21 U1.25 U1.27 U1.28 U1.29 U1.30 U1.31 U1.38 U1.40 U1.41 U1.46

## Polygon pours and split planes (outlines as drawn)
GND on L1(Signal) "GND_L01_P007" (solid, pour order 7): 105.871,77.729 105.938,77.795 108.097,77.795 108.097,76.918 109.915,75.1 109.915,72.171 108.081,72.171 107.828,72.424 107.828,75.955 107.184,75.955 105.896,77.243 105.896,77.77
+3V3 on L1(Signal) "+3V3_L01_P005" (solid, pour order 5): 105.375,65.5 105.375,66.85 106.457,66.85 106.375,72.3 106.375,75.75 107.625,75.75 107.625,66.85 108.625,66.85 108.625,65.5
+5V on L1(Signal) "+5V_L01_P004" (solid, remove dead copper, pour order 4): 104.25,76.2 102.9,76.2 102.9,72.725 103.675,71.95 105.525,71.95 105.525,73.671 104.25,74.557
VBUS on L1(Signal) "VBUS_L01_P001" (solid, pour order 1): 107.056,80.975 107.35,81.225 112.175,81.225 112.175,80.74 109.581,80.724 109.325,80.4 109.325,77.975 107.056,77.975 107.056,80.775
GND on L2(GND) "GND_L02_P012" (solid, pour order 12): 85,64.5 ccw(c85.5,64.5) 85.5,64 115,64 ccw(c115,64.5) 115.5,64.5 115.5,94.5 ccw(c114,94.5) 114,96 86.5,96 ccw(c86.5,94.5) 85,94.5
GND on L2(GND) "GND_L02_P011" (solid, pour order 11): 85,64.5 ccw(c85.5,64.5) 85.5,64 115,64 ccw(c115,64.5) 115.5,64.5 115.5,94.5 ccw(c114,94.5) 114,96 86.5,96 ccw(c86.5,94.5) 85,94.5
GND on L2(GND) "GND_L02_P010" (solid, pour order 10): 85,64.5 ccw(c85.5,64.5) 85.5,64 115,64 ccw(c115,64.5) 115.5,64.5 115.5,94.5 ccw(c114,94.5) 114,96 86.5,96 ccw(c86.5,94.5) 85,94.5
GND on L3(GND) "GND_L03_P013" (solid, pour order 13): 85,64.5 ccw(c85.5,64.5) 85.5,64 115,64 ccw(c115,64.5) 115.5,64.5 115.5,94.5 ccw(c114,94.5) 114,96 86.5,96 ccw(c86.5,94.5) 85,94.5

## Silkscreen, mask and mechanical layers (free items; w line width, h text height)
Top Overlay:
  drawing of 16 lines, arcs and shapes, not listed
  text "SWD" at 103.846,89.154 h0.7 r90
  text "SENSOR" at 89.154,87.154 h0.7
  text "USB" at 109.86,81.14 h0.7 r90
  text "GPIO" at 95.154,71.154 h0.7
Bottom Overlay:
  text "MARCH 2026" at 87,85 h0.7 r90